# Altium PCB STM32H743I-EVAL2PCBDESIGN.PcbDoc (part 17 of 23)
Units mil, origin at the board's own origin, x right, y up, seen from the top; angles counter-clockwise.
Board outline 6558 x 5417 mil, 8 copper layers (L1_TOP, L2_GND, L3_HS1, L4_POWER, L5_SIG, L6_HS2, L7_GND, L8_BOTTOM), stack 61.368 mil thick; 620 components, 588 nets, 2945 pads, 1724 vias.
Unrouted connection lines stored in the file: 1.
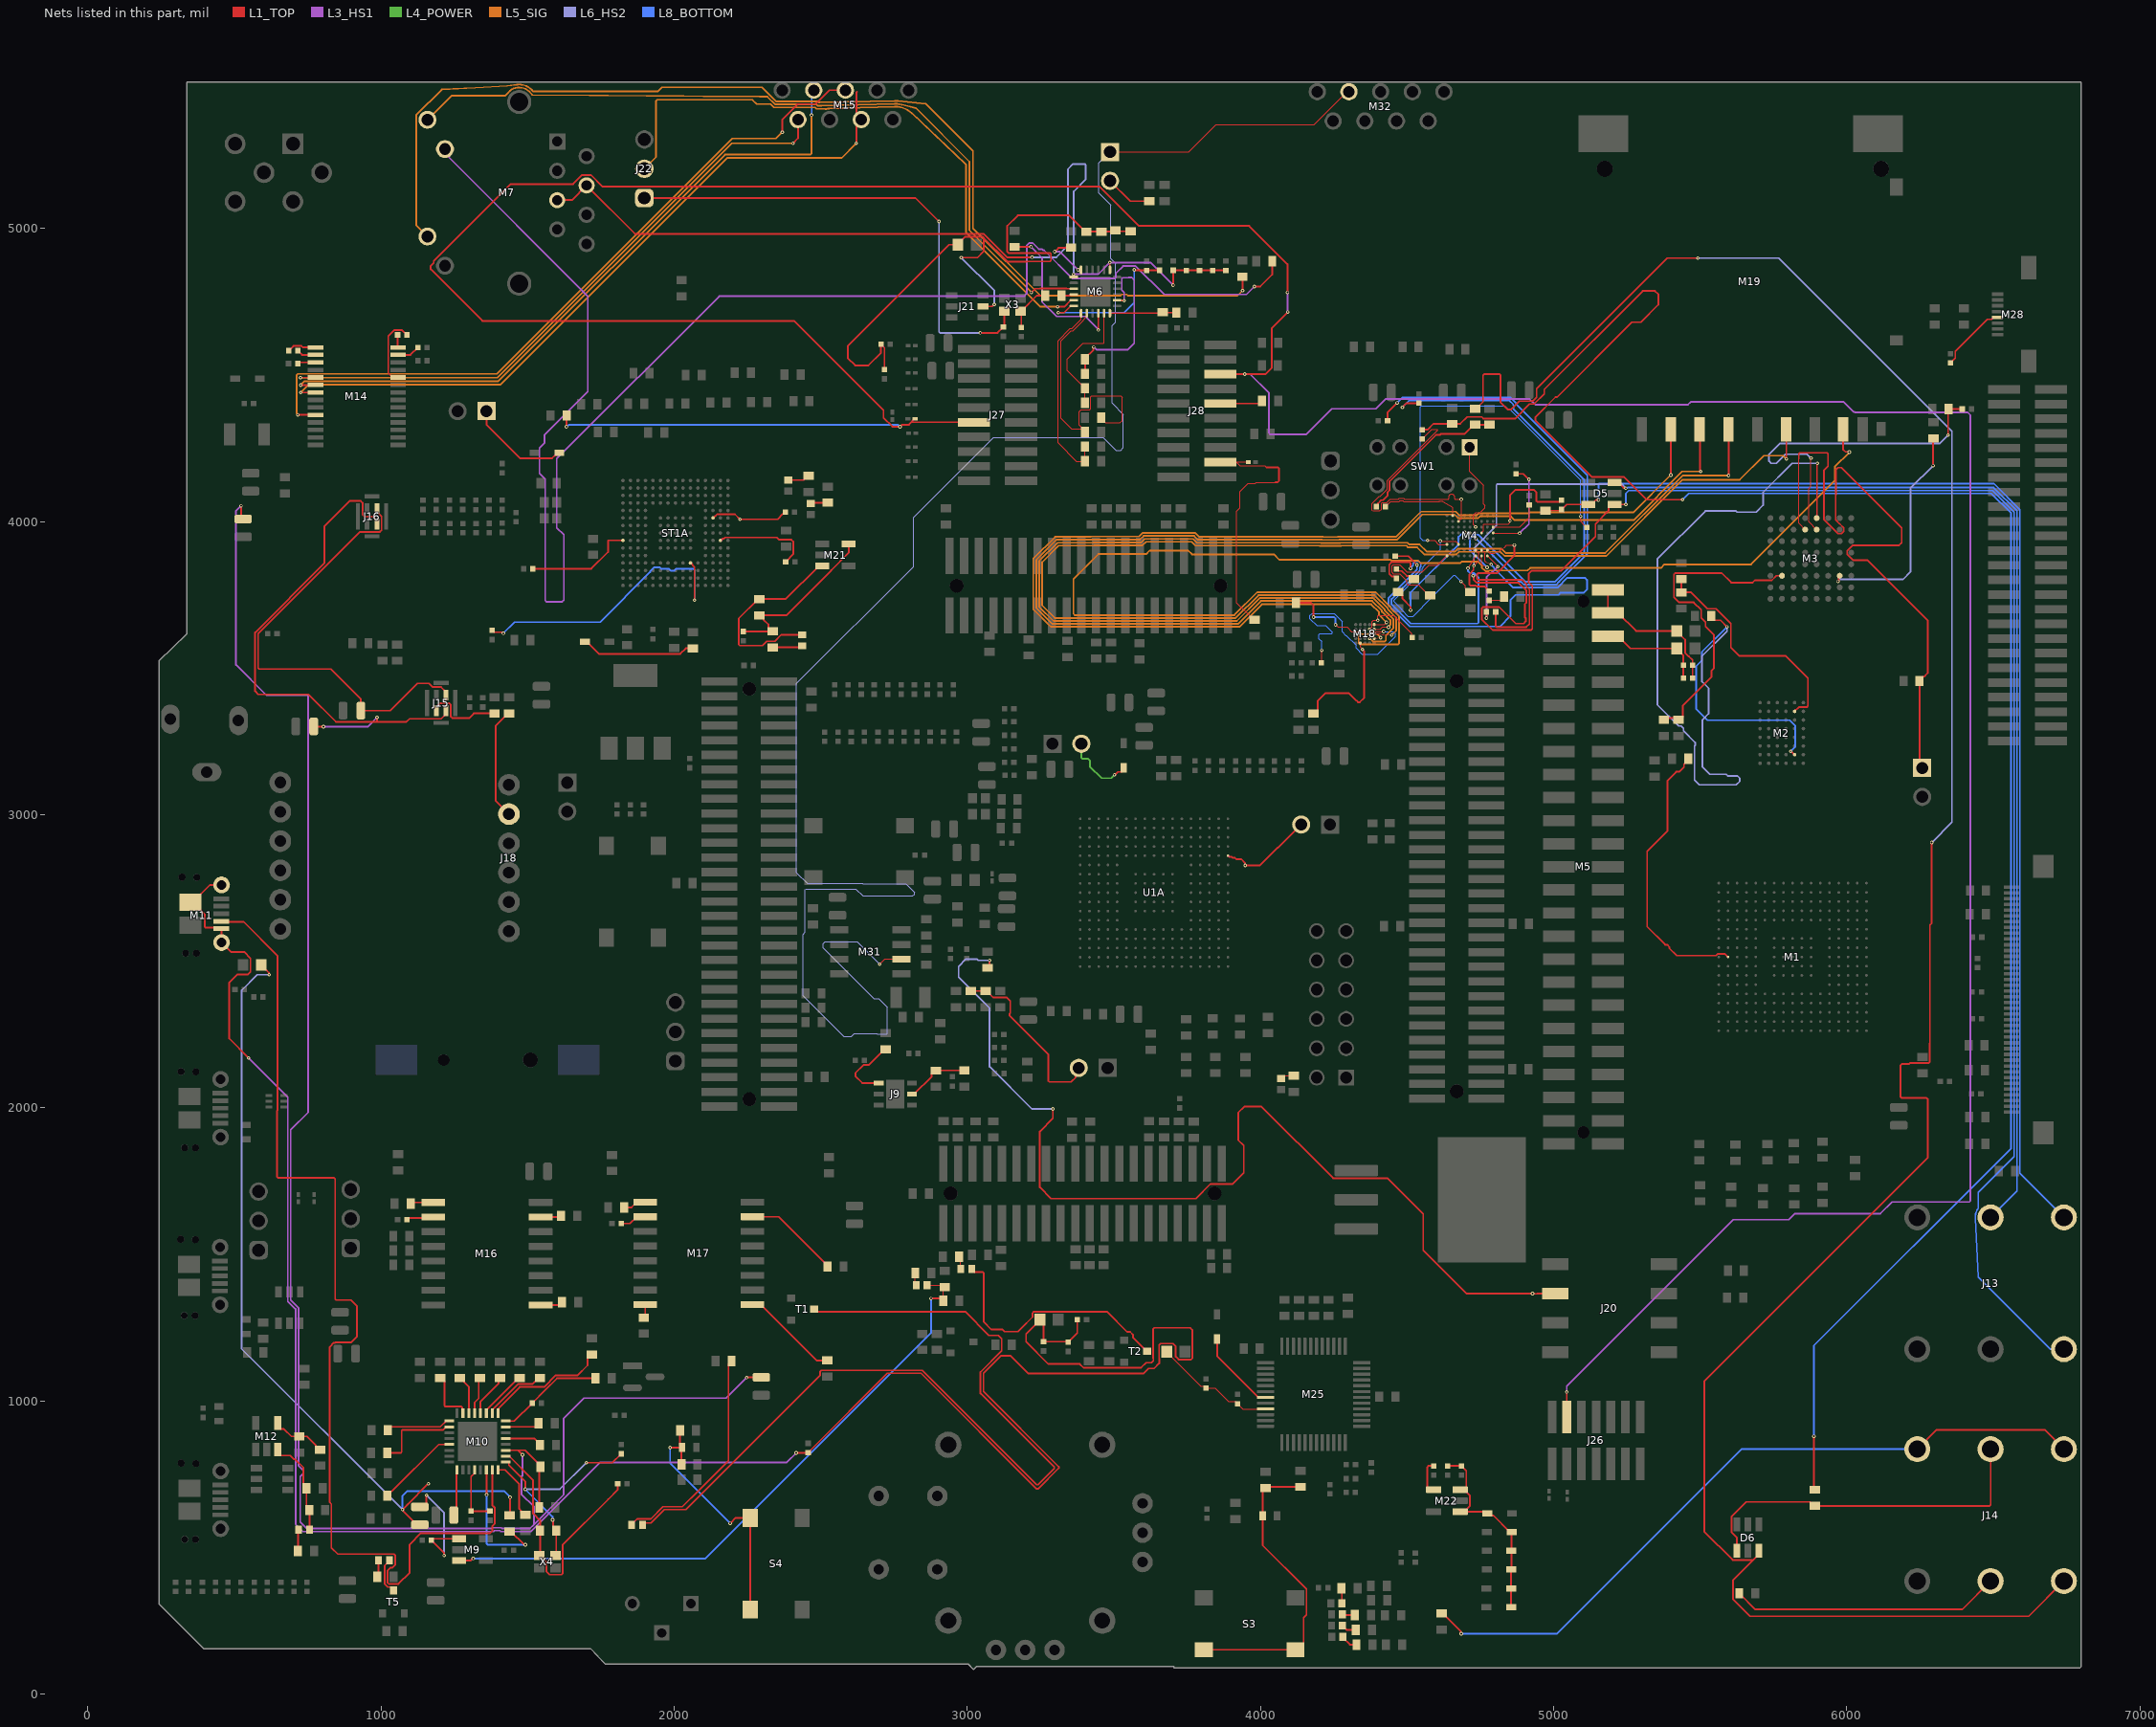
[diagram p14: the nets of this part, all layers, seen from the top]

## Via types
v1: diameter 12, hole 6, L1_TOP to L8_BOTTOM, tented both sides, 1724 vias

## Nets (pads, with @x,y where several pads share a name; then routed paths per layer and width w, separated by ;. In a path a pad name is that pad's centre, name@x,y a point inside that pad or via, vN(x,y) a via of type N, cw(c..) or ccw(c..) an arc to the next point about the centre after c; other vN are vias at no path point) (continued)
NetC47_2: C47.2 M3.B5 R108.2 | length 1219.6
  L1_TOP w4: v1(5878,4217) 5878,4119.92 5871,4112.92 5871,3999 M3.B5@5897.37,3972.63
  L1_TOP w6: v1(6346,4295) 6346,4382.44 R108.2@6347.56,4384 C47.2@6394.17,4384
  L6_HS2 w6: v1(5878,4217) 5865,4230 5791.62,4230 5760.62,4199 5742.62,4199 5735,4206.62 5735,4229.14 5772.86,4267 6318,4267 v1(6346,4295)
NetC74_1: C74.1 M4.D9 | length 340.2
  L1_TOP w4: M4.D9@4793.74,3961.69 4794.35,3961.07 4882.93,3961.07 v1(4884,3960)
  L1_TOP w6: C74.1@4872,4163.17 4896.83,4163.17 v1(4916,4144)
  L3_HS1 w6: v1(4884,3960) 4916,3992 v1(4916,4144)
NetC75_1: C75.1 M4.F1 | length 1369.1
  L1_TOP w4: v1(4570,3936) 4594.03,3936 4608.03,3922 4635.94,3922 M4.F1@4636,3922.06 ; v1(5092,4018) 5092,4000.83 5105.7,3987.13 5105.7,3987.05 5112.92,3979.83 C75.1@5113,3979.83
  L8_BOTTOM w4: v1(4570,3936) 4554,3936 4546,3944 4546,4391.66 4548.34,4394 4833.03,4394 4844.03,4383 4850.99,4383 5092,4141.99 v1(5092,4018)
NetC76_1: C76.1 M4.E6 | length 1599.2
  L1_TOP w2: M4.E6@4734.69,3942 v1(4735,3942)
  L1_TOP w6: C76.1@4433.83,4344 4433.83,4372.83 v1(4466,4405)
  L8_BOTTOM w6: v1(4466,4405) 4484,4423 4853.53,4423 4872,4404.53 4872,4401.57 5115,4158.57 5115,3890.47 5019.53,3795 5009.53,3785 4898.38,3785 4888.38,3795 4882,3795 v1(4735,3942)
NetC77_1: C77.1 M4.C9 | length 179.4
  L1_TOP w4: M4.C9@4794.26,3981.37 4884.37,3981.37 4917,4014 C77.1@4917,4057.17
NetC80_1: C80.1 D5.6 J13.4 M4.G6 | length 4829.6
  L1_TOP w2: v1(4728,3849) 4745,3866 4745,3892.31 M4.G6@4734.69,3902.63
  L1_TOP w6: v1(4728,3849) 4726.85,3847.85 4726.85,3834.24 4712.88,3820.26 4712.88,3784.98 4716.39,3781.46 4735.49,3781.46 4737.95,3779 4764,3779 4773.7,3769.3 4773.7,3769.22 4779.92,3763 C80.1@4780,3763 ; D5.6@5208.28,4133.4 5220.09,4133.4 5238.34,4115.15 5244.85,4115.15 v1(5246,4114)
  L6_HS2 w6: v1(4728,3849) 4728,3908.96 4805,3985.96 4805,4124.49 4808.51,4128 5232,4128 v1(5246,4114)
  L8_BOTTOM w6: v1(5246,4114) 5247.15,4115.15 5251.39,4115.15 5252.24,4116 6501.72,4116 6581,4036.72 6581,1716 J13.4@6491,1626
NetC80_2: C80.2 R115.2 | length 57.2
  L1_TOP w4: C80.2@4780,3731.33 4819.66,3731.33 4831.44,3743.11 R115.2@4831.44,3744
NetC81_1: C81.1 D5.4 J13.10 M4.H6 | length 6818.5
  L1_TOP w4: v1(4708,3841) M4.H6@4734.69,3882.94 M4.H6@4734.69,3882.43
  L1_TOP w6: C81.1@4463.67,3806.17 4457.45,3812.38 4449.38,3812.38 4439.36,3822.4 4439.36,3853.26 4448.15,3862.05 4508.49,3862.05 4512,3858.53 v1(4512,3840) ; v1(4726,3815) 4727.15,3813.85 4727.15,3802.76 4738.44,3791.46 4880.49,3791.46 4907.34,3764.62 4907.34,3723.38 4902,3718.05 4902,3673.38 4905,3670.38 4905,3659.62 4897.38,3652 4871.08,3652 4814.78,3708.3 4758.88,3708.3 4754.78,3704.2 4754.78,3667.25 4792.14,3629.9 4923.82,3629.9 4927.34,3633.41 4927.34,3780.8 4915,3793.14 4915,3822.38 4924.62,3832 5025.25,3832 5142.7,3949.45 5142.7,3991.95 5187.65,4036.9 5187.65,4049.79 5196.46,4058.6 v1(5246.57,4058.6)
  L8_BOTTOM w6: v1(4512,3840) 4512,3841.62 4521,3850.62 4521,3857.38 4528.62,3865 4539.38,3865 4547,3857.38 4547,3846.62 4544,3843.62 4544,3832.71 4486,3774.71 4447,3735.71 4447,3718 4513,3652 4740.49,3652 4744,3655.51 4744,3808.65 4727.83,3824.82 4726,3824.82 ; v1(4708,3841) 4708,3831 4714.18,3824.82 4726,3824.82 ; v1(4726,3815) 4726,3824.82 ; v1(5246.57,4058.6) 5246.57,4096.19 5256.38,4106 6497.57,4106 6571,4032.57 6571,1833 6449,1711 6449,1657.15 ccw(c6491,1626) 6438.78,1623.35 6449,1422 6695,1176 J13.10@6741,1176
NetC81_2: C81.2 R116.2 | length 74.2
  L1_TOP w6: C81.2@4463.67,3837.83 4469.88,3831.62 4481.97,3831.62 4499.24,3814.34 4512.89,3814.34 R116.2@4523.67,3803.56
NetC82_1: C82.1 M4.D7 | length 438.1
  L1_TOP w2: M4.D7@4754.37,3961.69 4761.17,3968.49 4761.17,3989.83 4762.34,3991 4846,3991 4851,3996 v1(4851,4003)
  L1_TOP w6: v1(4851,4003) 4851,4090 4869,4108 4934,4108 4941,4101 4941,4070.51 4944.51,4067 5021.17,4067 C82.1@5027,4072.83
NetC82_2: C82.2 D5.3 J13.1 R113.2 | length 4202.8
  L1_TOP w6: R113.2@4972,4037.44 5023.27,4037.44 C82.2@5027,4041.17 5027.08,4041.17 5044.52,4058.6 D5.3@5117.72,4058.6 5129.54,4058.6 5144.94,4074 v1(5153,4074)
  L8_BOTTOM w6: v1(5153,4074) 5153,4126.49 5156.51,4130 5322.86,4130 5323.86,4129 5947.99,4129 5948.99,4130 6501.86,4130 6591,4040.86 6591,1776 J13.1@6741,1626
NetC83_1: C83.1 M4.A2 | length 273.1
  L1_TOP w4: C83.1@4426.83,4051 4426.83,4051.08 4434.05,4058.3 4434.13,4058.3 4444.83,4069 4473.03,4069 4476.03,4072 4485.97,4072 4488.97,4069 4610.03,4069 4611.03,4070 4620.97,4070 4622.41,4068.74 4653.6,4050.4 4655.94,4048.06 4655.94,4021.26 M4.A2@4655.69,4021
NetC83_2: C83.2 R114.1 R117.1 | length 528.8
  L1_TOP w6: C83.2@4395.17,4051 4395.17,4051.08 4401.38,4057.3 4401.38,4062.45 4412.23,4073.3 4417.38,4073.3 4434.08,4090 4434.08,4100.83 4440.08,4106.83 4440.08,4137.15 4598.45,4295.52 4611.87,4295.52 4615.87,4299.52 4697.14,4299.52 4728.06,4330.44 R117.1@4732,4330.44 R114.1@4781,4330.44
NetC84_1: C84.1 M4.B3 | length 872.8
  L1_TOP w2: C84.1@4552,4282 4552.08,4282 4584.75,4314.66 4602.28,4314.66 4603.45,4313.49 4603.45,4311.83 4432.08,4140.46 4432.08,4110.14 4408.2,4086.26 4404.83,4086.26 4380.95,4062.37 4380.95,4039.63 4383.88,4036.7 4406.45,4036.7 4412.62,4042.86 4412.62,4062.37 4415.55,4065.3 4431.23,4065.3 4441.93,4076 4470.13,4076 4473.13,4079 4488.87,4079 4491.87,4076 4607.13,4076 4608.13,4077 4623.87,4077 4624.87,4076 4639.63,4076 4639.83,4076 4640.02,4076.04 ccw(c4639.63,4078) 4641.54,4078.61 cw(c4652,4082) 4662.46,4078.6 ccw(c4664.37,4078) 4663.97,4076.04 4664.17,4076 4664.37,4076 v1(4685,4076) 4685,4010.43 M4.B3@4675.63,4001.06
NetC84_2: C84.2 R119.1 R120.1 | length 7028.4
  L1_TOP w6: C84.2@4552,4313.67 4552.64,4314.3 4571.03,4314.3 4590.17,4333.44 R120.1@4654,4333.44 4681.25,4333.44 4705.03,4357.22 4755.1,4357.22 4761.1,4351.22 4868.22,4351.22 4918,4401 4931.86,4401 4932.86,4402 4934.65,4402 4968,4435.35 4968,4451 5304,4787 5346,4787 5357,4776 5357,4740 5297.5,4680.5 5267.5,4680.5 5012,4425 5006.62,4425 4937.73,4356.12 4937.73,4345.76 5131.28,4152.21 5240.17,4152.21 5317.38,4075 v1(5440,4075) ; v1(5888,879) 5888,699.56 R119.1@5891,696.56
  L8_BOTTOM w6: v1(5440,4075) 5461,4096 6493.43,4096 6561,4028.43 6561,1862 5888,1189 v1(5888,879)
NetC86_1: C86.1 M4.H8 | length 265.9
  L1_TOP w4: M4.H8@4774.31,3882.69 4775.29,3882.69 4810,3847.97 v1(4810,3846)
  L1_TOP w6: v1(4771,3671) C86.1@4771,3692
  L3_HS1 w6: v1(4771,3671) 4771,3810 4788.43,3827.43 4791.43,3827.43 v1(4810,3846)
NetC86_2: C86.2 M4.G8 | length 795.5
  L1_TOP w2: M4.G8@4774.06,3902.63 4784.1,3892.59 4798.28,3892.59 4816.9,3901.08 4817.23,3901.23 4825,3909 4832.36,3912.36 4840,3920 v1(4866,3920)
  L1_TOP w6: C86.2@4802.67,3692 4802.67,3643.41 4806.18,3639.9 4906.9,3639.9 4917.34,3650.34 4917.34,3768.76 4908,3778.1 4908,3786 4892.46,3801.54 4742.51,3801.54 4739,3805.05 4739,3820.49 4742.51,3824 4806.38,3824 4866,3883.62 v1(4866,3920)
NetC87_1: C87.1 M4.H7 | length 1737.3
  L1_TOP w4: M4.H7@4754.63,3882.69 4754.37,3882.43 4754.37,3854.45 4756.71,3852.11 v1(4773,3844)
  L1_TOP w6: v1(4484,4390) 4498.17,4404.17 C87.1@4541,4404.17
  L8_BOTTOM w6: v1(4484,4390) 4507,4413 4849.38,4413 4862,4400.38 4862,4397.43 4863.72,4395.72 4863.72,4383 5105,4141.72 5105,3894.62 5005.38,3795 4902.53,3795 4742.53,3955 4728.62,3955 4714,3940.38 4714,3903 v1(4773,3844)
NetC88_1: C88.1 M4.G7 | length 1534.2
  L1_TOP w2: M4.G7@4754.37,3902.63 4765,3892 4765,3865.83 4765,3865 4766.17,3863.83 v1(4787,3854)
  L1_TOP w6: C88.1@4459.5,3882 4504,3882 v1(4534,3852)
  L8_BOTTOM w6: v1(4534,3852) 4534,3836.86 4437,3739.86 4437,3713.86 4508.86,3642 4817.55,3642 4853,3677.45 4853,3731.91 4870.97,3749.89 5016.84,3749.89 5024.41,3757.46 5103.6,3757.46 5114,3767.86 5114,3801 5107,3808 5046.67,3808 5013.67,3775 4862.62,3775 4797,3840.62 4797,3842.79 4787,3852.79 v1(4787,3854)
NetC90_1: C90.1 C91.2 L3.1 M5.45 | length 362.8
  L1_TOP w6: M5.45@5185.32,3609.36 5219.82,3609.36 5262.17,3567.02 L3.1@5420.39,3567.02 5420.39,3565.44 5442.66,3543.17 C90.1@5442.66,3510.02 C91.2@5442.66,3466.02
NetC90_2: C90.2 C91.1 L4.1 M5.47 M5.49 | length 522.9
  L1_TOP w6: M5.49@5185.32,3766.84 M5.47@5185.32,3688.1 5219.82,3688.1 5280.91,3627.02 L4.1@5420.39,3627.02 5420.39,3625.44 5448.54,3597.29 5448.54,3552.59 5461.19,3539.94 5462,3539.94 5474.32,3527.62 C90.2@5474.32,3510.02 C91.1@5474.32,3466.02
NetC92_1: C92.1 C93.1 J21.5 L5.1 R130.2 R131.2 R132.2 R133.2 | length 2289.3
  L1_TOP w6: C92.1@2705.17,4604.92 2717,4593.08 C93.1@2717,4518.83 ; C92.1@2705.17,4605 2705.17,4575.71 2662.46,4533 2616.86,4533 2592,4557.86 2592,4599 2938,4945 L5.1@2967.9,4945 ; L5.1@2967.9,4946.57 2993.4,4972.08 3051.51,4972.08 3055.61,4967.98 ; v1(2979,4901) 3034.58,4901 3055.61,4922.02 3055.61,4967.98 ; J21.5@3053.75,4734 3085,4734 v1(3092,4741) ; R132.2@3557,4990.56 3508,4990.56 R133.2@3505,4993.56 3501,4989.56 R130.2@3457,4989.56 R131.2@3406,4989.56 3402.06,4989.56 3346.62,5045 3172.05,5045 3136.28,5009.24 3136.28,4920.76 3140.38,4916.66 3281.49,4916.66 3285,4913.15 3285,4891.23 3281.49,4887.72 3204.37,4887.72 3203.65,4887 3136.58,4887 3055.61,4967.98
  L6_HS2 w6: v1(2979,4901) 3092,4788 v1(3092,4741)
NetC94_1: C94.1 C95.1 M6.6 | length 535.9
  L1_TOP w6: v1(3310,4713) 3330.1,4713 3352.89,4735.79 M6.6@3363.16,4735.79 ; v1(3569,4859) 3570.62,4859 3572.62,4857 C94.1@3612,4857 3612.33,4857.33 C95.1@3656,4857.33
  L8_BOTTOM w6: v1(3310,4713) 3535.38,4713 3569,4746.62 v1(3569,4859)
NetC97_1: C97.1 C98.1 C99.1 C100.1 C101.1 M6.1 M6.19 M7.4 M7.5 | length 3255.8
  L1_TOP w6: M7.5@1600.91,5097.02 1650.91,5097.02 M7.4@1700.91,5147.02 1865.85,4982.08 3055.65,4982.08 3135.73,4902 v1(3221,4902) ; v1(3362,4844) 3362,4835.37 M6.1@3363.16,4834.21 ; v1(3486,4884) 3486,4859.05 M6.19@3486.21,4858.84 ; v1(3702,4807) C98.1@3702,4857.33 3746.83,4857.33 C97.1@3747,4857.17 3747.17,4857 C100.1@3792,4857 3792.17,4857.17 C101.1@3837,4857.17 C99.1@3882,4857.17
  L3_HS1 w6: v1(3362,4844) 3446,4844 v1(3486,4884) 3625,4884 v1(3702,4807)
  L6_HS2 w6: v1(3221,4902) 3304,4902 3342.93,4940.93 3342.93,5201.93 3361,5220 3400.49,5220 3404,5216.49 3404,5168 3362.93,5126.93 3362.93,4844.93 v1(3362,4844)
NetC102_1: C102.1 R146.1 X3.2 | length 160.1
  L1_TOP w6: X3.2@3181.56,4718.35 3184,4715.91 C102.1@3184,4663 ; X3.2@3183.53,4718.35 3236.18,4771 R146.1@3265.44,4771
NetC103_1: C103.1 J22.1 X3.1 | length 1700.2
  L1_TOP w6: J22.1@1898,5104 2823,5104 v1(2903,5024) ; v1(3044,4644) 3103.08,4644 3122.92,4663.83 C103.1@3123,4663.83 3126.44,4667.27 X3.1@3126.44,4718.35
  L6_HS2 w6: v1(2903,5024) 2903,4647.51 2906.51,4644 v1(3044,4644)
NetC104_2: C104.2 M9.1 SB40.1 | length 453.6
  L1_TOP w6: SB40.1@1132,638 1142.19,638 1153.85,649.66 1153.85,676.85 v1(1155,678) ; v1(1215,472) 1215,480.58 1171.67,523.92 C104.2@1171.67,524 1177.07,529.4 M9.1@1266.72,529.4
  L6_HS2 w6: v1(1155,678) 1215,618 v1(1215,472)
NetC106_1: C106.1 C107.1 C108.1 C109.1 L7.1 M11.5 M11.6 M11.7 M11.10 | length 8055.5
  L1_TOP w6: M11.10@349.3,2701.37 M11.10@357.3,2701.37 ; M11.6@455.59,2760.43 416.35,2760.43 M11.10@357.3,2701.37 ; v1(548,2170) 482,2236 482,2427 510,2455 545.38,2455 554.4,2464.02 554.4,2509.98 532.48,2531.9 487.27,2531.9 M11.7@455.59,2563.57 455.59,2609.83 451.02,2614.41 401.51,2614.41 398,2617.92 398,2660.67 M11.10@357.3,2701.37 ; v1(2416,822) C106.1@2457,822 ; C106.1@2457,823.33 2457.08,823.33 2463.3,829.55 2463.3,829.64 2727.67,1094 2842,1094 3236.51,699.49 3241.49,699.49 3312.01,770.01 3312.01,774.99 3054.98,1032.02 3054.98,1094 3114.44,1153.47 3148.24,1153.47 3208.91,1092.79 3600.93,1092.79 3618.33,1110.19 3636.93,1110.19 3654.5,1127.76 3654.5,1144.91 3654.39,1145.02 3654.39,1158.58 3654.27,1158.7 3654.27,1190.86 3658.49,1195.08 3701.3,1195.08 3711,1185.38 3711,1150.62 3720.7,1140.92 3763.51,1140.92 3767.61,1145.02 3767.61,1241.39 3760,1249 3637.66,1249 3634.15,1245.49 3634.15,1145.34 3634.39,1145.1 3634.39,1136.15 3628.43,1130.19 3610.05,1130.19 3592.65,1112.79 3396.26,1112.79 3383.6,1125.44 3276.31,1125.44 3200.32,1201.44 3200.32,1227.84 3247.9,1275.43 3260,1263.32 C109.1@3260,1201.83 3342.17,1201.83 C108.1@3344,1200 3344.08,1200 3375,1230.92 C107.1@3375,1277
  L3_HS1 w6: v1(548,2170) 681.64,2036.36 681.64,1339.45 708,1313.09 708,579 733,554 1383.47,554 1386.47,557 1405.53,557 1408.53,554 1510.91,554 1746.91,790 2384,790 v1(2416,822)
NetC110_1: C110.1 M10.32 R172.1 | length 366.5
  L1_TOP w6: M10.32@1425.5,931 1454.25,931 1515.17,991.92 1515.17,992.08 1560.08,1037 1560.25,1037 1600.25,1077 R172.1@1731.44,1077
NetC111_1: C111.1 C112.1 M10.20 | length 209.7
  L1_TOP w6: M10.20@1319,764.5 1319,753.5 1307,741.5 C111.1@1307,623.83 1307.17,623.67 C112.1@1371,623.67
NetC113_1: C113.1 M10.25 R171.1 X4.1 | length 773.1
  L1_TOP w6: M10.25@1425.5,791 1433.99,791 1435.99,789 1435.99,780.51 1491.71,724.79 v1(1491.71,698.29) ; v1(1585,594) 1585,592.38 1586.78,590.6 1586.78,567.78 R171.1@1597.56,557 1597.56,475.65 X4.1@1594.56,472.65 ; v1(1700,789) 1788.92,789 1818.92,819 C113.1@1819,819
  L6_HS2 w6: v1(1491.71,698.29) 1609.29,698.29 v1(1700,789)
  L8_BOTTOM w6: v1(1491.71,698.29) 1585,605 v1(1585,594)
NetC114_1: C114.1 M10.26 R171.2 X4.2 | length 907.1
  L1_TOP w6: M10.26@1425.5,811 1436.5,811 1518.66,728.84 1518.66,615.38 1542.44,591.6 R171.2@1542.44,557 1542.44,475.65 X4.2@1539.44,472.65 1541.41,472.65 1564.16,449.91 1564.16,416.38 1573.94,406.6 1615.18,406.6 1619.28,410.7 1619.28,508.28 1775,664 1807,696 C114.1@1807,717
NetC117_1: C117.1 M14.24 | length 245.1
  L1_TOP w6: M14.24@1058,4491.98 1039,4491.98 1024.5,4506.48 1024.5,4633.58 1044.22,4653.3 1071.78,4653.3 1088,4637.08 C117.1@1088,4637
NetC117_2: C117.2 M14.28 | length 43.4
  L1_TOP w6: C117.2@1056.33,4637 1056.33,4596 M14.28@1058,4594.34
NetC119_1: C119.1 M14.27 | length 77.8
  L1_TOP w6: M14.27@1058,4568.75 1100.17,4568.75 1125.33,4593.92 C119.1@1125.33,4594
NetC120_1: C120.1 M14.1 | length 100.5
  L1_TOP w6: C120.1@684.33,4583 684.33,4583.08 700.55,4599.3 728.12,4599.3 733.08,4594.34 M14.1@776,4594.34
NetC120_2: C120.2 M14.2 | length 66
  L1_TOP w6: C120.2@716,4583 716,4582.92 730.17,4568.75 M14.2@776,4568.75
NetC121_1: C121.1 M14.3 | length 61.9
  L1_TOP w6: C121.1@715.83,4539 719.99,4543.16 M14.3@776,4543.16
NetC122_2: C122.2 M16.2 | length 93.7
  L1_TOP w6: C122.2@1087.83,1618 1087.83,1618.08 1094.05,1624.3 1175.03,1624.3 M16.2@1177.73,1627
NetC123_2: C123.2 M17.2 | length 91.3
  L1_TOP w6: C123.2@1819,1605 1849.39,1605 1872.39,1628 M17.2@1900.73,1628
NetC124_1: C124.1 M18.B4 | length 221.5
  L1_TOP w2: M18.B4@4372.25,3632.75 4380,3640.5 4380,3658 4385,3663 v1(4400,3663)
  L1_TOP w4: v1(4400,3663) 4400,3677.66 4402.34,3680 4454.48,3680 4516.53,3617.96 4516.53,3605.73 C124.1@4517.17,3605.08
NetC125_1: C125.1 M18.C4 | length 762.8
  L1_TOP w2: M18.C4@4372.25,3617 4372.25,3617.25 4380,3625 v1(4420,3625)
  L1_TOP w4: C125.1@4207.83,3518 4209,3519.17 v1(4209,3561)
  L8_BOTTOM w4: v1(4209,3561) 4209,3591.03 4200,3600.03 4200,3613.66 4203.34,3617 4243.03,3617 4245.37,3619.34 4245.37,3622.66 4222.19,3645.84 4192.19,3645.84 4169,3669.03 4169,3678.97 4176.03,3686 4252.03,3686 4279,3659.03 4279,3624.03 4291.03,3612 4292.97,3612 4326,3578.97 4326,3569.03 4347.03,3548 4399.97,3548 4460,3608.03 4460,3617.97 4452.97,3625 v1(4420,3625)
NetC131_1: C131.1 M21.5 R221.1 R222.1 | length 601.8
  L1_TOP w6: C131.1@2236,3624.83 2334.71,3624.83 R221.1@2336,3626.12 2332.06,3626.12 2321.28,3636.9 2321.28,3649.16 2304.72,3665.72 2304.72,3669.66 2293.94,3680.44 R222.1@2290,3680.44 2381.9,3680.44 2535.35,3833.89 2535.35,3834 2595.28,3893.93 M21.5@2595.28,3923.4
NetC132_1: C132.1 ST1A.J1 | length 371
  L1_TOP w6: C132.1@1517.83,3839 1716.95,3839 1774,3896.05 1774,3936 1824.64,3936 ST1A.J1@1825.05,3935.59
NetC133_2: C133.2 ST1A.J14 | length 338.2
  L1_TOP w6: ST1A.J14@2157.72,3935.59 2159.3,3935.59 2164.98,3941.28 2168.73,3941.28 2173.05,3945.59 2350.43,3945.59 2357.67,3938.36 2399.48,3938.36 2406.72,3931.12 2406.72,3889.63 C133.2@2380.17,3863.08
NetC136_1: C136.1 M22.4 | length 117.9
  L1_TOP w6: M22.4@4590.92,696.4 4577.8,696.4 4569.18,705.02 4569.18,774.32 4572.7,777.83 C136.1@4591,777.83
NetC137_1: C137.1 C138.1 D16.1 D17.1 D18.1 D19.1 D20.1 D21.1 M22.1 M22.3 | length 718.7
  L1_TOP w6: C138.1@4638,777.83 C137.1@4686,777.83 4686.08,777.83 4702.3,761.62 4702.3,705.02 4693.69,696.4 M22.3@4681.08,696.4 4695.45,696.4 4714.06,677.79 4714.06,640.21 M22.1@4695.45,621.6 ; M22.1@4681.08,621.6 M22.1@4695.45,621.6 ; D21.1@4855.13,296 D20.1@4855.13,360 4855.13,423 D19.1@4856.13,424 D18.1@4856.13,488 4856.13,551 D17.1@4857.13,552 4850.83,552 4794.46,608.37 4781.5,608.37 D16.1@4773.87,616 4768.28,621.6 M22.1@4695.45,621.6
NetC151_1: C151.1 ST1A.M10 | length 1034
  L1_TOP w6: C151.1@1379,3628.83 1385.22,3622.62 1411.76,3622.62 1415.38,3619 v1(1417,3619) ; ST1A.M10@2055.36,3858.82 2069,3845.18 v1(2069,3732)
  L8_BOTTOM w6: v1(1417,3619) 1455,3657 1747,3657 1918,3828 1918,3830.53 1931.47,3844 1950.53,3844 1955.53,3839 1981.62,3839 1988.62,3832 1999.38,3832 2006.38,3839 2065.49,3839 2069,3835.49 v1(2069,3732)
NetC152_1: C152.1 ST1A.F13 | length 269.3
  L1_TOP w6: ST1A.F13@2132.13,4012.36 2132.87,4012.36 2138.55,4018.05 2138.81,4018.05 2145.76,4025 2207,4025 v1(2224,4008) 2352.44,4008 2370.14,4025.7 2372.95,4025.7 2379.17,4031.92 C152.1@2379.17,4032
NetC161_1: C161.1 C162.1 L8.1 M25.9 | length 419.1
  L1_TOP w4: L8.1@3679.9,1168 3679.9,1166.43 3795.94,1050.38 3806.78,1050.38 C161.1@3814,1043.17 3845.11,1043.17 3890.89,997.38 3914.78,997.38 C162.1@3922,990.17 3922.08,990.17 3939.94,972.31 M25.9@4017,972.31
NetC169_2: C169.2 M28.4 | length 238.6
  L1_TOP w6: C169.2@6354,4541.17 6354.08,4541.17 6370.3,4557.38 6370.3,4580.3 6480.38,4690.38 6494,4690.38 6500.78,4697.16 M28.4@6514.56,4697.16
NetD1_1: D1.1 J4.2 | length 251.6
  L1_TOP w6: v1(3502,3136) 3503.32,3136 3513.27,3145.94 3526.37,3145.94 3534,3153.57 D1.1@3534,3159.87
  L4_POWER w6: J4.2@3389,3242 3389,3193.62 3391.67,3190.94 3411.56,3190.94 3418,3184.5 3418,3164.62 3457.62,3125 3491,3125 v1(3502,3136)
NetD3_1: D3.1 J5.1 | length 349.7
  L1_TOP w6: J5.1@1359.43,4377 1359.43,4330.57 1473.63,4216.37 1583.45,4216.37 1593.45,4226.37 1600.5,4226.37 D3.1@1608.13,4234
NetD6_1: D6.1 J14.4 R119.2 | length 1227
  L1_TOP w6: D6.1@5625.6,487.72 5625.6,532.94 5606.79,551.75 5606.79,604.8 5656.99,655 5873.5,655 5887.06,641.44 R119.2@5891,641.44 6487.49,641.44 6491,644.96 J14.4@6491,835
NetD6_3: D6.3 J14.10 R117.2 | length 8204
  L1_TOP w6: R117.2@4732,4385.56 4735.94,4385.56 4759,4408.62 4759,4499.49 4762.51,4503 4815.76,4503 4819.28,4499.49 4819.28,4406.34 4843.62,4382 4854.38,4382 4883.38,4411 4927.72,4411 4928.72,4412 4930.51,4412 4942,4423.49 4942,4453.28 5387.72,4899 v1(5492,4899) ; D6.3@5700.4,487.72 5700.4,475.91 5681.59,457.1 ; v1(6290,2905) 6290,2629.38 6284,2623.38 6284,2220.14 6283.2,2219.35 6283.2,2156.34 6279.1,2152.24 6216.09,2152.24 6212.71,2148.85 6187.37,2148.85 6183.85,2145.34 6183.85,2110.38 6183,2109.53 6183,2090.47 6183.85,2089.62 6183.85,2036.91 6187.37,2033.39 6272.49,2033.39 6276,2029.88 6276,1829 5514,1067 5514,553.99 5610.89,457.1 5681.59,457.1 ; J14.10@6741,385 6621,265 5670.05,265 5612.66,322.38 5612.66,388.17 5681.59,457.1
  L6_HS2 w6: v1(5492,4899) 5768.22,4899 6359,4308.22 6359,2974 v1(6290,2905)
NetD8_1: D8.1 M9.3 R151.1 R152.1 | length 2205.6
  L1_TOP w4: D8.1@2862.7,1394 2917.44,1394 R152.1@2923,1388.44 2917.44,1382.88 R151.1@2917.44,1341
  L1_TOP w6: M9.3@1266.72,454.6 1304.97,454.6 1312.38,462 v1(1314,462) ; v1(2876,1349) 2909.44,1349 R151.1@2917.44,1341
  L8_BOTTOM w6: v1(1314,462) 2106.38,462 2876,1231.62 v1(2876,1349)
NetD8_2: D8.2 R153.1 | length 43.2
  L1_TOP w4: R153.1@2822.44,1436 2822.44,1396.86 D8.2@2825.3,1394
NetD9_1: D9.1 M12.3 R182.2 R183.1 | length 340.3
  L1_TOP w6: M12.3@647.4,833.72 647.4,821.91 656.21,813.1 689.94,813.1 702.27,800.77 705.67,800.77 734.66,771.78 734.66,712.78 R183.1@745.44,702 745.44,636 R182.2@754.44,627 755.7,625.74 D9.1@755.7,560
NetD9_2: D9.2 R181.2 | length 72.8
  L1_TOP w6: R181.2@716.44,488 716.44,558.14 D9.2@718.3,560
NetD11_1: D11.1 R206.1 R207.1 S3.1 S3.2 | length 1070
  L1_TOP w6: S3.2@3806.5,150.42 S3.1@4119.5,150.42 4124.42,150.42 4147.01,173.01 4147.01,259.54 4157.01,269.54 4157.01,357.59 4007.39,507.2 D11.1@4007.39,608 4007.39,692.83 R206.1@4017,702.44 4021,706.44 R207.1@4136,706.44
NetD12_1: D12.1 R209.1 R211.1 S4.1 S4.2 | length 892.5
  L1_TOP w6: v1(1986,840) 2025.39,840 D12.1@2026.39,841 ; R209.1@2019.44,899 2019.44,847.95 D12.1@2026.39,841 ; R211.1@2024.44,783 2024.44,839.05 D12.1@2026.39,841 ; v1(2191,582) 2209.5,600.5 S4.2@2259.42,600.5 S4.1@2259.42,287.5
  L8_BOTTOM w6: v1(1986,840) 1986,787 v1(2191,582)
NetD13_1: D13.1 M21.3 R222.2 | length 681.7
  L1_TOP w6: D13.1@2437,3613.7 2364.98,3613.7 2343.06,3591.78 2315.38,3591.78 2300.56,3576.95 2223.8,3576.95 2219.7,3581.05 2219.7,3669.2 2286.06,3735.56 R222.2@2290,3735.56 2379.87,3735.56 2492.91,3848.6 M21.3@2504.72,3848.6
NetD13_2: D13.2 R221.2 | length 103.2
  L1_TOP w6: R221.2@2336,3571 2431.7,3571 D13.2@2437,3576.3
NetD14_1: D14.1 R223.1 | length 393
  L1_TOP w6: D14.1@1694.87,3590 1701.17,3590 1742.51,3548.66 2020.62,3548.66 2039.4,3567.44 R223.1@2063,3567.44
NetD15_2: D15.2 R229.2 | length 59.1
  L1_TOP w6: D15.2@2466,4061.7 2468.74,4064.44 R229.2@2524,4064.44
NetD33_1: D33.1 J28.3 R253.2 | length 910.8
  L1_TOP w4: J28.3@3863.12,4203 J28.3@3917,4203 ; D33.1@3958.7,4203 J28.3@3917,4203 ; R253.2@3980,3665.56 3968.22,3677.34 3963.53,3677.34 3918,3722.87 3918,4035.44 3930.31,4047.74 3930.31,4101.88 3958.43,4130 3982.31,4130 3985.31,4133 4050,4133 4051,4134 ; 4020.64,4185 4015.64,4190 3930,4190 J28.3@3917,4203
  L1_TOP w6: 4020.64,4185 4020.75,4184.89 4059.49,4184.89 4063,4181.37 4063,4139 4058,4134 4051,4134
NetD38_1: D38.1 J26.12 J27.10 J28.15 R254.2 | length 14197
  L1_TOP w6: v1(1632,4324) 1632,4361.44 R254.2@1632.56,4362 ; D38.1@2821.61,4351 2819.15,4351 2812.37,4344.22 2812.37,4342.2 2809.17,4339 ; J27.10@3022.88,4339 2809.17,4339 ; J28.15@3863.12,4503 v1(3946.12,4503) 4015.84,4503 4038.78,4525.94 4038.78,4660.78 v1(4093,4715) ; v1(4092,4782) 4092,4878.51 3961.51,5009 3585.3,5009 3450.8,5143.5 1754.72,5143.5 1715.64,5182.57 1686.18,5182.57 1655.07,5151.46 1441.84,5151.46 1179.33,4888.95 1179.33,4883.33 1169,4873 1169,4861 1345.24,4684.76 2409.24,4684.76 2714,4380 2714,4354.53 2744.53,4324 v1(2770,4324) 2771.62,4324 2778.14,4330.51 2800.69,4330.51 2809.17,4339 ; J26.12@5045,945 v1(5045,1030)
  L3_HS1 w6: v1(3946.12,4503) 3965.2,4503 4029,4439.2 4029,4301.51 4032.51,4298 4157.15,4298 4244.15,4385 4393.15,4385 4426.15,4418 4917.94,4418 4936.94,4399 5458.66,4399 5467.9,4408.24 5989.61,4408.24 6023.85,4374 6026.62,4374 6027.62,4373 6412,4373 6421.78,4363.22 6421.78,1999.46 6422,1999.24 6422,1938.76 6421.78,1938.54 6421.78,1681.81 6418.26,1678.29 6154.29,1678.29 6114.99,1639 5823.62,1639 5802.62,1618 5612.37,1618 5045,1050.63 v1(5045,1030) ; v1(4092,4782) 4092.5,4781.5 4092.5,4715.5 v1(4093,4715)
  L8_BOTTOM w6: v1(1632,4324) 1633.62,4324 1639.62,4330 2763.49,4330 2769.49,4324 v1(2770,4324)
NetD39_1: D39.1 M25.7 | length 281.7
  L1_TOP w6: D39.1@3852,1210.87 3852,1152.44 3990.24,1014.2 4014.49,1014.2 M25.7@4017,1011.69
NetJ3_2: J3.2 U1A.E17 | length 325.5
  L1_TOP w6: U1A.E17@3888.98,2859.99 3889.76,2859.99 3893.25,2856.5 3900.58,2856.5 3904.08,2853 3912.41,2853 3917.42,2847.99 3934.39,2847.99 3946.85,2835.53 3946.85,2828.15 v1(3948,2827) 3998.62,2827 4059.13,2887.52 4059.97,2887.52 J3.2@4138.79,2966.33
NetJ9_1: J9.1 R96.2 | length 236.5
  L1_TOP w6: J9.1@2697.5,2084.4 2641.21,2084.4 2618,2107.62 2618,2118.38 2645.31,2145.7 2663.32,2145.7 2717.06,2199.44 R96.2@2721,2199.44
NetJ9_5: J9.5 R95.1 R97.1 | length 218.3
  L1_TOP w6: J9.5@2810.5,2047 2818.76,2047 2878.28,2106.52 2878.28,2115.78 2889.06,2126.56 R95.1@2893,2126.56 2894,2127.56 R97.1@2990,2127.56
NetJ12_1: J12.1 M3.B4 R109.2 | length 2374.6
  L1_TOP w4: 5836.37,4214 5836.37,3994.26 M3.B4@5858,3972.63
  L1_TOP w6: 5836.37,4214 5836.37,4231.24 5839.88,4234.75 5932.49,4234.75 5936,4231.24 5936,4188.9 5922.74,4175.64 5922.74,4006.2 5938.05,3990.89 5938.28,3990.89 5953.58,3975.59 5953.58,3975.36 5970.31,3958.63 5981.91,3958.63 5990.11,3966.83 5990.11,3978.43 5976.22,3992.31 5976,3992.31 5962.11,4006.2 5962.11,4090.92 5962.85,4091.66 5962.85,4176.38 5970.47,4184 5981.75,4184 6187.48,3978.27 6187.48,3928.13 6178.61,3919.26 6021.05,3919.26 6001.48,3899.69 6001.48,3888.09 6021.05,3868.52 6070.48,3868.52 6276,3663 6276,3483.02 6263.7,3470.72 6259.34,3470.72 6248.56,3459.94 6248.56,3168.32 J12.1@6257.67,3159.21
NetJ14_1: J14.1 J14.3 R118.2 | length 2471.2
  L1_TOP w6: R118.2@4618,274.56 4621.94,274.56 4683.85,212.64 4683.85,206.15 v1(4685,205) ; J14.3@6241,835 6307,901 6675,901 J14.1@6741,835
  L8_BOTTOM w6: v1(4685,205) 5011,205 5641,835 J14.3@6241,835
NetJ14_2: J14.2 R122.1 | length 920.5
  L1_TOP w6: R122.1@5633.44,343 5688.44,288 6394,288 J14.2@6491,385
NetJ15_2: J15.2 R121.2 | length 267.7
  L1_TOP w6: J15.2@1188,3354.85 1188,3365.68 1202.87,3380.55 1232.24,3380.55 1237.7,3375.08 1237.7,3334.62 1243.17,3329.15 1299.58,3329.15 1315.87,3345.44 R121.2@1387,3345.44
NetJ15_3: J15.3 J16.3 SB38.2 | length 1900.6
  L1_TOP w6: SB38.2@770,3301 771,3300 v1(803,3300) ; J16.3@985.73,3991.43 985.73,4002.25 970.86,4017.13 943.24,4017.13 936.9,4023.47 936.9,4063.93 930.56,4070.28 892.28,4070.28 806,3984 806,3857.53 570.12,3621.65 570.12,3421.33 580.86,3410.59 752.03,3410.59 845.62,3317 984,3317 ; v1(986,3332) 986,3319 984,3317 ; J15.3@1221.46,3354.85 1221.46,3344.02 1204.84,3327.4 1097.02,3327.4 1086.62,3317 984,3317
  L3_HS1 w6: v1(803,3300) 954,3300 v1(986,3332)
NetJ15_4: J15.4 J16.4 SB37.2 | length 1551.1
  L1_TOP w6: J16.4@985.73,4044.57 985.73,4033.75 1001.59,4017.89 1001.59,3970.81 995.63,3964.85 927.47,3964.85 580.12,3617.51 580.12,3500.39 583.64,3496.88 828.12,3496.88 931,3394 SB37.2@931,3355 1031.37,3355 1124.37,3448 1163.69,3448 1176.24,3435.45 1204.84,3435.45 1221.46,3418.83 J15.4@1221.46,3408
NetJ18_5: J18.5 R123.2 | length 383
  L1_TOP w6: J18.5@1436,3002 1391,3047 1391,3304.38 1432.06,3345.44 R123.2@1436,3345.44
NetJ20_04: J20.04 R125.1 | length 3483.5
  L1_TOP w6: R125.1@3069,2477.44 3076,2484.44 v1(3076,2503) ; v1(3292,1996) 3292,1964 3247,1919 3247,1728.6 3285.62,1689.98 3779.63,1689.98 3829.57,1739.92 3905.31,1739.92 3943,1777.62 3943,1870.43 3924.38,1889.05 3924.38,1983.53 3944.86,2004 4003.14,2004 4247.63,1759.51 4432.49,1759.51 4555,1637 4555,1513.09 4702.09,1366 v1(4928,1366) 4928.81,1365.19 4945.19,1365.19 4946,1366 J20.04@5006.06,1366
  L6_HS2 w6: v1(3076,2503) 3036.78,2503 3032.78,2507 2995.19,2507 2970,2481.81 2970,2446.19 3076,2340.19 3076,2140 3220,1996 v1(3292,1996)
NetJ22_2: J22.2 M6.5 | length 2109.6
  L1_TOP w6: v1(3308,4733) 3330.42,4733 3352.89,4755.47 M6.5@3363.16,4755.47
  L5_SIG w6: J22.2@1898,5204 1937.71,5243.71 1937.71,5435.68 1939.47,5437.44 1941.22,5439.2 1946.2,5439.2 2267,5438.65 2280.92,5424.73 2328.99,5424.73 2340.22,5413.5 2480.69,5413.5 2485.69,5408.5 2514.35,5408.5 ccw(c2523.1,5428.97) 2515.51,5408.04 2515.56,5408.02 ccw(c2517.55,5413.68) 2515.81,5407.94 ccw(c2517.55,5413.68) 2517.55,5407.68 ccw(c2517.55,5413.68) 2519.23,5407.92 cw(c2530,5372) 2528.94,5409.49 ; 2528.98,5409.49 2575.73,5410.75 2752.6,5415.55 ; 2752.63,5415.55 cw(c2754.81,5334.04) 2810.91,5393.21 2992.49,5221.06 2996,5217.54 2996,4985.62 3018.5,4963.12 3205,4776.62 3248.62,4733 v1(3308,4733)
NetJ25_2: J25.2 R217.2 R218.1 | length 615.9
  L1_TOP w6: R217.2@3012,2398.56 R218.1@3062,2398.56 3065.94,2398.56 3088.5,2376 3134.98,2376 3146.72,2364.26 3146.72,2322.62 3143.78,2319.68 3143.78,2314.71 3276,2182.49 3276,2091.51 3279.51,2088 3354,2088 3369.28,2103.28 3369.28,2125.28 J25.2@3380,2136
NetJ28_11: J28.11 R258.1 | length 146.1
  L1_TOP w6: J28.11@3863.12,4403 3996.44,4403 R258.1@4005.44,4412
NetJ29_1: J29.1 M31.6 M32.2 | length 6453.7
  L1_TOP w4: v1(2701,2490) 2718,2507 M31.6@2775.3,2507 ; J29.1@3486.67,5261.21 3755.35,5261.21 3848.14,5354 4183.33,5354 4296.33,5467 M32.2@4301.97,5467
  L6_HS2 w4: v1(2701,2490) 2624,2567 2515.03,2567 2508,2559.97 2508,2545.16 2681.19,2371.97 2697.07,2371.97 2727,2342.04 2727,2253.4 2724.66,2251.05 2692.67,2251.05 2690.73,2253 2614.04,2253 2604.54,2243.5 2577.76,2243.5 2439,2382.26 2439,2591.74 2446.52,2599.26 2446.52,2744.48 2448.86,2746.83 2619.25,2746.83 2643.68,2722.39 2814.07,2722.39 2819.34,2727.66 2819.34,2735.12 2790.57,2763.89 2643.69,2763.89 2642.75,2764.83 2454.2,2764.83 2417,2802.03 2417,3447.99 2816,3846.99 2816,4013.99 3089.01,4287 3463.03,4287 3507.03,4243 3523,4243 3532,4252 3532,4366 3493.5,4404.5 3493.5,4669.47 3505,4680.97 3505,4881.97 3490,4896.97 3490,5080 3448.67,5121.33 3448.67,5223.21 J29.1@3486.67,5261.21
NetJ29_2: J29.2 R267.1 | length 163.1
  L1_TOP w6: J29.2@3486.67,5162.79 3556.02,5093.44 R267.1@3621,5093.44
NetL6_1: L6.1 R162.2 SB40.2 | length 2858.9
  L1_TOP w6: L6.1@591.1,2487 591.1,2485.43 606.61,2469.92 608.18,2469.92 616.85,2461.25 616.85,2455.15 v1(618,2454) ; SB40.2@1132,577 1121.66,577 1074.96,623.7 1074.96,627.04 v1(1073,629) 1089.23,645.23 1089.23,645.73 1160.49,717 v1(1161,717) ; R162.2@1438,609.56 1440,611.56 v1(1440,671)
  L6_HS2 w6: v1(618,2454) 577.62,2454 524,2400.38 524,1178 v1(1073,629)
  L8_BOTTOM w6: v1(1073,629) 1073,676 1089,692 1419,692 v1(1440,671)
NetLD1_2: LD1.2 R94.2 | length 47.1
  L1_TOP w4: LD1.2@4071,2099.7 4080.81,2109.51 4090.24,2109.51 4090.28,2109.56 R94.2@4114,2109.56
NetLD2_1: LD2.1 T1.3 | length 3074.4
  L1_TOP w6: LD2.1@1891.7,576 1898.7,583 1920.05,583 1965.69,628.64 2039.64,628.64 2497.28,1086.28 2497.28,1099.12 2502.16,1104 2846.14,1104 3236.51,713.63 3241.49,713.63 3296.44,768.59 3296.44,773.56 3044.98,1025.02 3044.98,1098.14 3117.22,1170.38 3117.22,1211.62 3105.84,1223 3073.64,1223 2992.45,1304.19 2486.18,1304.19 T1.3@2477.37,1313
NetLD2_2: LD2.2 R147.1 | length 767.9
  L1_TOP w6: LD2.2@1854.3,576 1854.3,577.97 1873.33,597 1919.91,597 1961.55,638.64 2027.5,638.64 2084.77,695.91 2085.87,695.91 2184.78,794.82 2184.78,1125.22 R147.1@2195.56,1136
NetLD3_1: LD3.1 T2.3 | length 884.6
  L1_TOP w6: LD3.1@3014.7,1450 3014.7,1448.03 3023.51,1439.22 3052.49,1439.22 3056,1435.71 3056,1268.92 3081.92,1243 3120.57,1243 3127.57,1236 3172.56,1236 3179.56,1243 3183.56,1247 3222.39,1285.84 3222.39,1286.97 3222.39,1299.98 3226.49,1304.08 3239.51,1304.08 3240.64,1304.08 3476.32,1304.08 3545.19,1235.21 3555.45,1235.21 3565.41,1225.25 3565.41,1214.99 3611.4,1169 T2.3@3613.37,1169
NetLD3_2: LD3.2 R154.1 | length 44.4
  L1_TOP w4: R154.1@2971.56,1492 2977.3,1486.26 LD3.2@2977.3,1450
NetLD4_1: LD4.1 T5.3 | length 128.2
  L1_TOP w6: LD4.1@1028.7,456 1028.7,454.03 1011.78,437.11 1011.78,375.24 1022.87,364.15 1033.19,364.15 1042,355.34 T5.3@1042,353.37
NetLD4_2: LD4.2 R186.1 | length 57.6
  L1_TOP w6: R186.1@987.44,400 991.3,403.86 LD4.2@991.3,456
NetLD5_1: LD5.1 R212.1 | length 58.7
  L1_TOP w6: LD5.1@4280.7,194 4280.7,192.03 4304.73,168 R212.1@4327.44,168
NetLD6_1: LD6.1 R213.1 | length 53.1
  L1_TOP w6: LD6.1@4279.7,233 4279.7,231.03 4288.51,222.22 4290.48,222.22 4294.7,218 R213.1@4325.44,218
NetLD7_2: LD7.2 R214.1 | length 51.5
  L1_TOP w6: R214.1@4276.44,360 4277.7,358.74 LD7.2@4277.7,309
NetLD8_1: LD8.1 R215.1 | length 43.6
  L1_TOP w6: LD8.1@4279.7,271 4281.7,269 R215.1@4322.44,269
NetLD9_1: LD9.1 R230.2 | length 76
  L1_TOP w6: LD9.1@2389,4141.7 2440.65,4141.7 2455.06,4156.12 R230.2@2459,4156.12
NetM1_J2: M1.J2 R100.2 | length 963.4
  L1_TOP w6: R100.2@5459.05,3191.02 5459.05,3187.08 5444.71,3172.74 5444.71,3162.12 5428.89,3146.3 5418.27,3146.3 5388.72,3116.75 5388.72,2945.12 5319,2875.41 5319,2617.86 5380.86,2556 5387.38,2556 5395,2548.38 5395,2544 5420,2519 5553.86,2519 5559.38,2524.52 5585.02,2524.52 M1.J2@5595.02,2514.52
NetM2_B5: M2.B5 R101.1 R102.2 | length 794.8
  L1_TOP w6: R101.1@5435.49,3803.46 R102.2@5435.49,3758.57 5469.43,3758.57 5525.27,3702.73 5554.73,3702.73 5605,3652.46 5605,3569.67 5632.42,3542.24 5791.03,3542.24 5867.77,3465.51 5867.77,3370.51 5864.25,3367 5836.89,3367 M2.B5@5822.47,3352.58
NetM2_G5: M2.G5 M3.A5 R105.2 | length 3431.8
  L1_TOP w6: R105.2@5538.05,3678.02 5538.05,3674.08 5548.83,3663.3 5569.7,3663.3 v1(5592,3641) ; v1(5809,3216) 5810.21,3216 5821.26,3204.94 M2.G5@5822.47,3204.94 ; M3.A5@5897.24,4012.13 5898.85,4013.74 5898.85,4197.85 v1(5900,4199)
  L6_HS2 w6: v1(5592,3641) 5591.62,3640.62 5591.62,3626 5506,3540.38 5506,3454 5529,3431 5529,3344.62 5508,3323.62 5508,3162.51 5532.51,3138 5588.38,3138 5594.38,3132 5627.38,3132 5635,3124.38 5635,3113.62 5623.38,3102 5497.37,3102 5481,3118.37 5481,3233.62 5483,3235.62 5483,3246.38 5443,3286.38 5443,3294.93 5435.38,3302.54 5426.84,3302.54 5354,3375.38 5354,3872 5518,4036 5622.81,4036 5626.46,4032.35 5691.01,4032.35 5715,4056.33 5715,4100.16 5813.84,4199 v1(5900,4199)
  L8_BOTTOM w6: v1(5592,3641) 5506,3555 5506,3525.86 5486,3505.86 5486,3361.62 5525.19,3322.42 5805.96,3322.42 5824,3304.38 5824,3231 v1(5809,3216)
NetM3_F2: M3.F2 R103.2 R104.2 | length 1083.9
  L1_TOP w6: R104.2@5376.49,3323.57 5382.91,3330 R103.2@5426.49,3330 ; R103.2@5426.49,3323.57 R103.2@5426.49,3330 ; M3.F2@5779.26,3815.15 5759.69,3815.15 5744.32,3799.78 5686.86,3799.78 5679.08,3792 5605.83,3792 5573.6,3824.24 5414.87,3824.24 5410.77,3820.14 5410.77,3741.9 5428.43,3724.24 5478.1,3724.24 5503.71,3698.63 5503.71,3670.96 5518.09,3656.57 5518.09,3642.43 5547,3613.53 5547,3500.27 5539,3492.27 5539,3470.3 5441.2,3372.5 5441.2,3334.35 5436.85,3330 R103.2@5426.49,3330
NetM3_F7: M3.F7 R106.2 | length 769.8
  L1_TOP w6: v1(5970,3796) 5970,3797.62 5973.43,3801.06 5973.43,3813.84 M3.F7@5974.74,3815.15 ; v1(6295,4191) 6295,4282.44 R106.2@6296,4283.44
  L6_HS2 w6: v1(5970,3796) 5977,3803 6192.39,3803 6217.7,3828.3 6217.7,4113.7 v1(6295,4191)
NetM4_C6: M4.C6 SW1.1 | length 322.4
  L1_TOP w2: SW1.1@4713.48,4253.96 4713.48,4171.5 4761.05,4123.93 4761.05,4059.51 4765,4055.56 4765,4046.44 4749.56,4031 4735,4031 4730.84,4026.84 4730.84,4026.68 4726.69,4022.53 4726.69,3990.14 4732.83,3983.17 M4.C6@4734.63,3981.37 ; v1(4734,3982) M4.C6@4734.69,3981.37 ; M4.C6@4734.69,3981.37 M4.C6@4734.63,3981.37
NetM4_D4: M4.D4 M4.D5 R111.2 | length 446.9
  L1_TOP w4: M4.D4@4695.31,3961.69 4695.69,3961.69 v1(4697,3963) ; M4.D4@4697,3961.69 M4.D5@4715,3961.69
  L1_TOP w6: R111.2@4469.67,3759.56 4473.6,3759.56 4484.38,3748.78 4484.38,3736.78 4512,3709.16 v1(4512,3698)
  L8_BOTTOM w6: v1(4512,3698) 4512,3757.8 4675.66,3921.46 4675.66,3947.87 4689.13,3961.34 4693.72,3961.34 4695.38,3963 v1(4697,3963)
NetM4_F3: M4.F3 R110.1 | length 711.8
  L1_TOP w2: v1(4613,3934) 4614.2,3932.8 4666.2,3932.8 4675.63,3923.37 M4.F3@4675.63,3922.31 ; v1(4684,3796) 4699.28,3780.72 4699.28,3772.34 4712.06,3759.56 R110.1@4716,3759.56
  L8_BOTTOM w2: v1(4613,3934) 4614,3933 4614,3905.46 4555,3846.46 4555,3843.3 4552,3840.3 4552,3829.4 4455,3732.4 4455,3726.6 4481.2,3700.4 4481.2,3699.1 4503.3,3677 4520.7,3677 4553,3709.3 4553,3710.56 4659.77,3817.32 4662.68,3817.32 v1(4684,3796)
NetM4_H1: M4.H1 R112.1 | length 414.2
  L1_TOP w4: R112.1@4578.67,3748.44 4574.73,3748.44 4542.64,3780.53 4542.64,3781.44 4540.3,3783.78 4503.46,3783.78 4499.95,3787.29 4499.95,3796.89 4474.83,3822 4452.5,3822 4448.36,3826.13 4448.36,3849.53 4451.88,3853.05 4475.45,3853.05 4500.5,3828 4551.81,3828 4574.66,3850.85 4604.16,3850.85 M4.H1@4636,3882.69
NetM6_3: M6.3 M7.9 | length 2676.4
  L1_TOP w6: v1(3218,4782) 3230.84,4794.84 3247.89,4794.84 3248.76,4795.72 3337.24,4795.72 3338.11,4794.84 M6.3@3363.16,4794.84
  L5_SIG w6: M7.9@1158,5371.03 1239.97,5453 1422.66,5453 1423.49,5453.2 1424.43,5454 1426.04,5455.61 1433.85,5464.54 cw(c1470.99,5432.06) 1510.61,5461.46 1516.07,5456 2292.01,5449.73 2318.13,5449.73 2344.36,5423.5 2484.83,5423.5 2488.01,5420.32 2489.06,5419.28 2502.24,5419.28 2752.51,5425.55 cw(c2754.81,5334.04) 2777.19,5422.8 2824,5411 3006.93,5228.08 3006.93,4994.17 3218,4783.09 v1(3218,4782)
NetM6_4: M6.4 R146.2 | length 44.3
  L1_TOP w6: R146.2@3320.56,4771 3347.81,4771 3351.96,4775.16 M6.4@3363.16,4775.16
NetM6_7: M6.7 R128.1 R135.2 | length 646.9
  L1_TOP w4: M6.7@3387.79,4711.16 3387.79,4690.18 3356.84,4659.23 3350.95,4659.23 3309,4617.28 3309,4268.78 3371.78,4206 R128.1@3401.44,4206 R135.2@3401.44,4256
NetM6_8: M6.8 R127.1 R134.2 | length 924.7
  L1_TOP w4: R134.2@3401.44,4306 3401.44,4309.94 R134.2@3394.25,4317.13 ; M6.8@3407.47,4711.16 3407.47,4700.89 3395.79,4689.2 3395.79,4686.86 3360.15,4651.23 3354.26,4651.23 3319,4615.97 3319,4353.03 3354.9,4317.13 R134.2@3394.25,4317.13 ; R127.1@3456.56,4355 3456.56,4351.06 3470.62,4337 3521,4337 3528,4344 3528,4424 3523.28,4428.72 3423.56,4428.72 3421.22,4426.37 3421.22,4384.8 3417.71,4381.28 3387.74,4381.28 3381.66,4375.2 3381.66,4329.72 R134.2@3394.25,4317.13
NetM6_10: M6.10 R136.2 | length 550.1
  L1_TOP w6: R136.2@3161,4937.44 3161.56,4938 v1(3217,4938) ; M6.10@3446.84,4711.16 3447,4711 v1(3447,4654)
  L3_HS1 w6: v1(3217,4938) 3255,4900 3255,4749.62 3304.62,4700 3402.53,4700 3447,4655.53 v1(3447,4654)
NetM6_11: M6.11 R129.1 R138.2 | length 423.3
  L1_TOP w4: R129.1@3401.44,4405 R138.2@3401.44,4455 ; R138.2@3401.44,4455.53 3341,4515.97 3341,4554.23 3394.77,4608 3464.18,4608 3466.53,4610.34 M6.11@3466.53,4711.16
NetM6_12: M6.12 R139.2 R140.2 | length 229.3
  L1_TOP w6: M6.12@3486.21,4711.16 3662.6,4711.16 R139.2@3666,4714.56 3667.56,4713 R140.2@3713.44,4713
NetM6_14: M6.14 R141.2 R145.1 | length 621.5
  L1_TOP w6: R141.2@3401.44,4504 3401.44,4557.94 3429.85,4586.35 3429.85,4594.85 v1(3431,4596) ; M6.14@3510.84,4755.47 3511.49,4754.82 3534.18,4754.82 v1(3535,4754)
  L3_HS1 w6: v1(3431,4596) 3432.21,4596 3442.21,4586 3546.1,4586 3569,4608.9 3569,4824.38 3560.38,4833 3549.5,4833 3548.5,4832 3530.51,4832 3527,4828.49 3527,4825.24 3526.79,4825.03 3526.79,4789.46 3535,4781.25 v1(3535,4754)
NetM6_24: M6.24 R137.1 | length 177.5
  L1_TOP w6: v1(3298,4921) 3311,4934 3352.56,4934 R137.1@3354,4935.44 ; v1(3378,4859) 3387.63,4859 M6.24@3387.79,4858.84
  L3_HS1 w6: v1(3298,4921) 3316,4921 v1(3378,4859)
NetM7_10: M7.10 R144.1 | length 5410.1
  L1_TOP w6: v1(3979,4802) 3999,4802 4040.12,4843.12 R144.1@4040.12,4889
  L3_HS1 w6: M7.10@1217.84,5271.03 1217.84,5256.16 1705,4769 1705,4443.14 1557,4295.14 1557,4267.38 1540,4250.38 1540,4165.07 1560,4145.07 1560,3731 1564.21,3726.79 1617.36,3726.79 1623.21,3732.64 1623.21,3954.93 1599,3979.14 1599,4214.67 2153.33,4769 3193.49,4769 3202.55,4778.07 3202.55,4941.94 3211.62,4951 3222.38,4951 3244.08,4929.31 3255.02,4929.31 3258.33,4926 3261.62,4926 3357.62,4830 3503.47,4830 3507,4833.53 3507,4847.67 3531.33,4872 3574.38,4872 3671.38,4775 3952,4775 v1(3979,4802)
NetM7_11: M7.11 R142.1 | length 3806
  L1_TOP w6: R142.1@3938,4835.88 3939,4834.88 v1(3939,4788)
  L5_SIG w6: M7.11@1158,4973 1119.49,5011.51 1119.49,5386.98 1206.5,5474 1321.41,5480.33 1430.5,5486.77 1461.99,5490.71 cw(c1471.53,5432.14) 1471.53,5491.48 cw(c1471.53,5436.91) 1489.56,5488.41 1489.62,5488.39 cw(c1470.99,5432.06) 1518.18,5468.04 1518.45,5467.76 1943.84,5467.74 1958.1,5482 2300,5482 2348.5,5433.5 2488.98,5433.5 2492.05,5430.43 2496.98,5430.43 2752.77,5435.56 cw(c2754.81,5334.04) 2764.66,5435.1 2858,5426 2859.69,5424.31 3019,5265 3019,5001 3249,4771 3522.3,4771 3526.3,4775 3543.7,4775 3547.7,4771 3922,4771 v1(3939,4788)
NetM10_1: M10.1 R161.2 | length 427.9
  L1_TOP w6: M10.1@1399,957.5 1401,959.5 1401,975 1473,1047 1556.11,1047 1596.11,1087 1670.25,1087 1704.28,1121.03 1704.28,1147.66 1715.06,1158.44 R161.2@1719,1158.44
NetM10_2: M10.2 R156.2 | length 219.5
  L1_TOP w6: M10.2@1379,957.5 1379,968.5 1468.16,1057.66 1517.28,1057.66 1538.06,1078.44 R156.2@1542,1078.44
NetM10_3: M10.3 R170.2 | length 170.5
  L1_TOP w6: M10.3@1359,957.5 1359,968.5 1409.58,1019.08 1409.7,1019.08 1469.06,1078.44 R170.2@1473,1078.44
NetM10_4: M10.4 R169.2 | length 148.6
  L1_TOP w6: M10.4@1339.08,957.58 1339.08,997.08 1401.18,1059.18 1401.18,1073.62 R169.2@1406,1078.44
NetM10_5: M10.5 R168.2 | length 128.4
  L1_TOP w6: M10.5@1319,957.5 1319,994.38 1333.06,1008.45 1333.06,1074.5 R168.2@1337,1078.44
NetM10_6: M10.6 R167.2 | length 133.4
  L1_TOP w6: R167.2@1269,1078.44 1299,1048.44 M10.6@1299,957.5
NetM10_7: M10.7 R166.2 | length 187.3
  L1_TOP w6: R166.2@1201,1078.44 1204.94,1078.44 1215.72,1067.66 1215.72,984.01 1219.23,980.5 1273.49,980.5 1277,976.99 1277,959.5 M10.7@1279,957.5
NetM10_9: M10.9 R165.2 | length 222.9
  L1_TOP w6: R165.2@1022.56,900 1022.56,900.22 1033.34,911 1201.5,911 1221.5,931 M10.9@1232.5,931
NetM10_10: M10.10 R164.2 | length 291
  L1_TOP w6: R164.2@1020.56,822 1066.49,822 1070,825.51 1070,897.49 1073.51,901 1211.5,901 1221.5,911 M10.10@1232.5,911
NetM10_13: M10.13 R163.2 | length 285.7
  L1_TOP w6: R163.2@1021.56,676 1021.56,679.94 1032.34,690.72 1036.28,690.72 1196.56,851 M10.13@1232.5,851
NetM10_17: M10.17 SB39.1 | length 159.1
  L1_TOP w6: SB39.1@1248,610 1257,619 1257,762.5 M10.17@1259,764.5
NetM10_22: M10.22 R162.1 | length 458.7
  L1_TOP w6: M10.22@1359,764.5 1360,763.5 v1(1360,679) ; R162.1@1438,554.44 1441.94,554.44 1487.38,509 v1(1492,509)
  L8_BOTTOM w6: v1(1360,679) 1360,512.51 1363.51,509 v1(1492,509)
NetM10_23: M10.23 M11.4 | length 3632.7
  L1_TOP w6: M11.4@454.61,2636.41 456.61,2634.41 530.59,2634.41 646.22,2518.78 646.22,1990.35 645,1989.13 645,1764.01 648.51,1760.5 839.49,1760.5 843,1756.98 843,1347.51 846.51,1344 896.79,1344 918,1322.79 918,1220.21 896.79,1199 843,1199 842,1198 838.49,1198 824.53,1184.04 824.53,653.42 830.34,647.62 830.34,498.66 852.22,476.78 1043.41,476.78 1047.51,472.68 1047.51,439.32 1038.16,429.97 1031.13,429.97 1021.78,420.62 1021.78,379.38 1025.88,375.28 1059.24,375.28 1097.52,413.56 1097.52,509.93 1135.8,548.21 1371.7,548.21 1379,555.51 1379,572.27 1382.51,575.78 1383.2,575.78 1387.3,579.88 1387.3,635.78 1383.2,639.88 1382.51,639.88 1379,643.4 M10.23@1379,764.5
NetM10_24: M10.24 R159.1 | length 208.5
  L1_TOP w6: M10.24@1399,764.5 1422.5,764.5 1471,716 1471,631.56 1477.28,625.28 1477.28,621.34 1488.06,610.56 R159.1@1492,610.56
NetM10_27: M10.27 R174.2 R176.1 SB2.2 SB41.2 | length 6265
  L1_TOP w6: v1(522,4054) 522,4016 SB41.2@529,4009 ; M10.27@1425.5,831 1467,831 ; v1(1482,816) 1467,831 ; R174.2@1539.44,636 1539.44,771 R176.1@1543.44,775 1543.44,778.94 1491.38,831 1467,831 ; v1(2247,1079) 2248,1080 SB2.2@2297,1080
  L3_HS1 w6: v1(522,4054) 505,4037 505,3511 608,3408 747.49,3408 751,3404.49 751,1984 691.64,1924.64 691.64,1343.59 718,1317.23 718,778.38 734,762.38 734,751.62 724,741.62 724,586.23 746.23,564 1379.33,564 1382.33,567 1409.67,567 1412.67,564 1506.77,564 1521.63,578.86 ; v1(1482,816) 1482,744.42 1478.71,741.13 1478.71,681.45 1521.63,638.54 1521.63,578.86 ; v1(2247,1079) 2177.12,1009.12 1691.73,1009.12 1623,940.38 1623,680.23 1521.63,578.86
NetM10_29: M10.29 R158.2 | length 127.4
  L1_TOP w6: M10.29@1425.5,871 1523.38,871 1541.44,852.94 R158.2@1541.44,849
NetM10_31: M10.31 R157.2 | length 118.6
  L1_TOP w6: M10.31@1425.5,911 1526.66,911 1537.44,921.78 R157.2@1537.44,924
NetM12_4: M12.4 R184.2 R185.1 | length 191.4
  L1_TOP w6: M12.4@647.4,924.28 647.4,912.46 656.21,903.65 668.7,903.65 693.8,878.56 R185.1@721,878.56 747,878.56 777.28,848.28 777.28,844.34 788.06,833.56 R184.2@792,833.56
NetM14_5: M14.5 M15.6 | length 2150.8
  L1_TOP w6: v1(725,4491) 775.02,4491 M14.5@776,4491.98 ; v1(2405,5291) 2421.97,5307.97 M15.6@2421.97,5372
  L5_SIG w6: v1(725,4491) 1396,4491 2196,5291 v1(2405,5291)
NetM14_6: M14.6 M15.2 | length 2339.4
  L1_TOP w6: v1(725.49,4465.9) M14.6@775.51,4465.9
  L5_SIG w6: v1(725.49,4465.9) 738.59,4479 1400,4479 2173,5252 2464.49,5252 2468,5255.51 v1(2468,5386.92)
  L8_BOTTOM w6: v1(2468,5386.92) 2469.15,5388.07 2469.15,5465.16 M15.2@2475.98,5472
NetM14_7: M14.7 M15.8 | length 2473.8
  L1_TOP w6: v1(725.49,4440.31) M14.7@775.51,4440.31 ; v1(2621.06,5291) 2622.06,5292 2622.06,5465 2623.06,5466
  L5_SIG w6: v1(725.49,4440.31) 752.18,4467 1406,4467 2179.97,5240.97 2571.03,5240.97 v1(2621.06,5291)
NetM14_10: M14.10 M15.3 | length 2496.9
  L1_TOP w6: v1(716,4364) M14.10@775.04,4364.01 ; v1(2368.52,5328.5) 2368.52,5371.58 2421.63,5424.7 2481.71,5424.7 2529.02,5472 M15.3@2584.02,5472
  L5_SIG w6: v1(716,4364) 716,4365.62 712,4369.62 712,4500.49 715.51,4504 1394.86,4504 2197.86,5307 2347.02,5307 v1(2368.52,5328.5)
NetM16_1: M16.1 R189.2 | length 78.8
  L1_TOP w6: R189.2@1100.56,1673 1104.56,1677 M16.1@1177.73,1677
NetM16_9: M16.9 R194.1 | length 76.9
  L1_TOP w6: M16.9@1544.27,1327 1608.44,1327 R194.1@1617.44,1336
NetM16_15: M16.15 R191.1 | length 70.8
  L1_TOP w6: M16.15@1544.27,1627 1609.44,1627 R191.1@1613.44,1631
NetM17_1: M17.1 R190.2 | length 78.6
  L1_TOP w6: R190.2@1829.56,1660 1854.39,1660 1872.39,1678 M17.1@1900.73,1678
NetM17_8: M17.8 R195.2 | length 45.8
  L1_TOP w6: R195.2@1896,1284.12 1900.73,1288.85 M17.8@1900.73,1328
NetM17_9: M17.9 R196.1 | length 333.6
  L1_TOP w6: M17.9@2267.27,1328 2295.61,1328 2486.06,1137.56 R196.1@2522,1137.56
NetM17_15: M17.15 R192.1 | length 327.9
  L1_TOP w6: M17.15@2267.27,1628 2356.38,1628 2522.44,1461.94 R192.1@2522.44,1458
NetM18_A5: M18.A5 M19.1 | length 3980.3
  L1_TOP w2: M18.A5@4388,3648.5 4422.5,3648.5 v1(4430,3656)
  L1_TOP w6: M19.1@5399.74,4314.24 5400,4313.98 v1(5400,4159)
  L5_SIG w6: v1(4430,3656) 4404.33,3681.67 4404.33,3691.48 4377.82,3718 4004.71,3718 3927.71,3641 3285.56,3641 3225,3701.56 3225,3873.69 3299.31,3948 3420.62,3948 3421.62,3949 3585.28,3949 3597.28,3961 3777.99,3961 3790.99,3948 4213.86,3948 4214.36,3947.5 4263.64,3947.5 4264.14,3948 4461.86,3948 4547.86,4034 4666.19,4034 4678.19,4022 4738.67,4022 4744.67,4028 4915.21,4028 4918.21,4031 5272,4031 v1(5400,4159)
NetM18_B5: M18.B5 M19.2 | length 4102.5
  L1_TOP w2: M18.B5@4388,3632.75 4408.75,3632.75 4416,3640 v1(4437,3640)
  L1_TOP w6: M19.2@5498.17,4314.24 5500,4312.4 5500,4174.62 5502,4172.62 v1(5502,4171)
  L5_SIG w6: v1(4437,3640) 4437,3641.62 4443,3647.62 4443,3663.76 4414.33,3692.43 4414.33,3695.62 4380.96,3729 4001.57,3729 3923.57,3651 3289.7,3651 3235,3705.7 3235,3869.54 3303.46,3938 3424.76,3938 3425.76,3939 3589.43,3939 3601.43,3951 3773.85,3951 3786.85,3938 4209.72,3938 4210.21,3937.5 4267.79,3937.5 4268.28,3938 4466,3938 4552,4024 4662.05,4024 4674.05,4012 4742.81,4012 4748.81,4018 4854.38,4018 4867.38,4005 5273,4005 5439,4171 v1(5502,4171)
NetM18_C2: M18.C2 R203.2 | length 300
  L1_TOP w2: v1(4256,3648) 4264,3640 4295.56,3640 4310.81,3624.75 4333.01,3624.75 M18.C2@4340.76,3617
  L1_TOP w6: R203.2@4120.56,3723 4172,3723 4181,3714 v1(4181,3674)
  L8_BOTTOM w6: v1(4181,3674) 4251.3,3674 4256,3669.3 v1(4256,3648)
NetM18_C5: M18.C5 M19.5 | length 4407.1
  L1_TOP w2: M18.C5@4388,3617 4408,3617 4416.97,3614.43 ccw(c4420,3625) 4419.61,3614.01 v1(4448,3613)
  L1_TOP w6: M19.5@5793.44,4314.24 5794,4313.68 v1(5794,4214)
  L5_SIG w6: v1(4448,3613) 4463,3628 4463,3672.05 4434.33,3700.71 4434.33,3703.91 4389.24,3749 3993.28,3749 3915.28,3671 3297.98,3671 3255,3713.98 3255,3861.26 3311.74,3918 3433.05,3918 3434.05,3919 3597.71,3919 3609.71,3931 3765.57,3931 3778.57,3918 4201.43,3918 4201.93,3917.5 4276.07,3917.5 4276.57,3918 4497.47,3918 4503.47,3912 4534.81,3912 4558.81,3888 4668.19,3888 4677.19,3897 4818.47,3897 4832.47,3883 5180.47,3883 5440.47,4143 5635.01,4143 5717.01,4225 5783,4225 v1(5794,4214)
NetM18_D4: M18.D4 M19.3 | length 4270.4
  L1_TOP w6: M19.3@5596.59,4314.24 5597,4313.83 v1(5597,4157)
  L5_SIG w6: v1(4372.25,3601.25) 4372.96,3601.25 4383.21,3591 4424.49,3591 4428,3594.51 4428,3611.38 4453,3636.38 4453,3667.9 4424.33,3696.57 4424.33,3699.77 4385.1,3739 3997.43,3739 3919.43,3661 3293.84,3661 3245,3709.84 3245,3865.4 3307.6,3928 3428.9,3928 3429.9,3929 3593.57,3929 3605.57,3941 3769.71,3941 3782.71,3928 4205.58,3928 4206.07,3927.5 4271.93,3927.5 4272.42,3928 4501.62,3928 4507.62,3922 4543,3922 4567,3898 4664.05,3898 4673.05,3907 4822.62,3907 4836.62,3893 5176.33,3893 5440.33,4157 v1(5597,4157)
NetM18_D5: M18.D5 M19.7 | length 4678.1
  L1_TOP w2: M18.D5@4388,3601.25 v1(4410,3604)
  L1_TOP w6: M19.7@5987.34,4314.24 5987.34,4246.66 5995.85,4238.15 6007.85,4238.15 v1(6009,4237)
  L5_SIG w6: v1(4410,3604) 4398,3616 4338.51,3616 4335,3612.49 4335,3584.51 4338.51,3581 4469.49,3581 4473,3584.51 4473,3676.19 4444.33,3704.85 4444.33,3708.05 4393.38,3759 3989.14,3759 3911.14,3681 3366.51,3681 3362,3685.51 3362,3804.53 3446.47,3889 3610.14,3889 3622.14,3901 3753.14,3901 3766.14,3888 4045.86,3888 4063.86,3870 4443.24,3870 4446.24,3867 4537.38,3867 4546.38,3858 4680.62,3858 4685.62,3863 4742.38,3863 4755,3850.38 4755,3843.62 4767.62,3831 4778.38,3831 4780.38,3833 4911.47,3833 4920.47,3842 5366.14,3842 5378.14,3854 5674,3854 5959.48,4139.48 5959.48,4187.48 v1(6009,4237)
NetM18_E2: M18.E2 R204.2 | length 432.7
  L1_TOP w2: M18.E2@4340.76,3585.5 4340.76,3571.24 v1(4348,3564)
  L1_TOP w6: R204.2@4181,3344.56 4184.94,3344.56 4195.72,3355.34 4195.72,3388.59 4222.13,3415 4300.62,3415 4326.62,3389 4327.6,3389 4332.6,3384 4339,3384 4354,3399 4354,3557.49 4348,3563.49 v1(4348,3564)